# Altium PCB asar_feather.PcbDoc (part 2 of 4)
Units mm, origin at the board's own origin, x right, y up, seen from the top; angles counter-clockwise.
Board outline 50.8 x 22.86 mm, 6 copper layers (Top Layer, L2-GND, L3-SIG, L4-SIG, L5-VCC3V3, Bottom Layer), stack 1.568 mm thick; 174 components, 154 nets, 827 pads, 1521 vias.
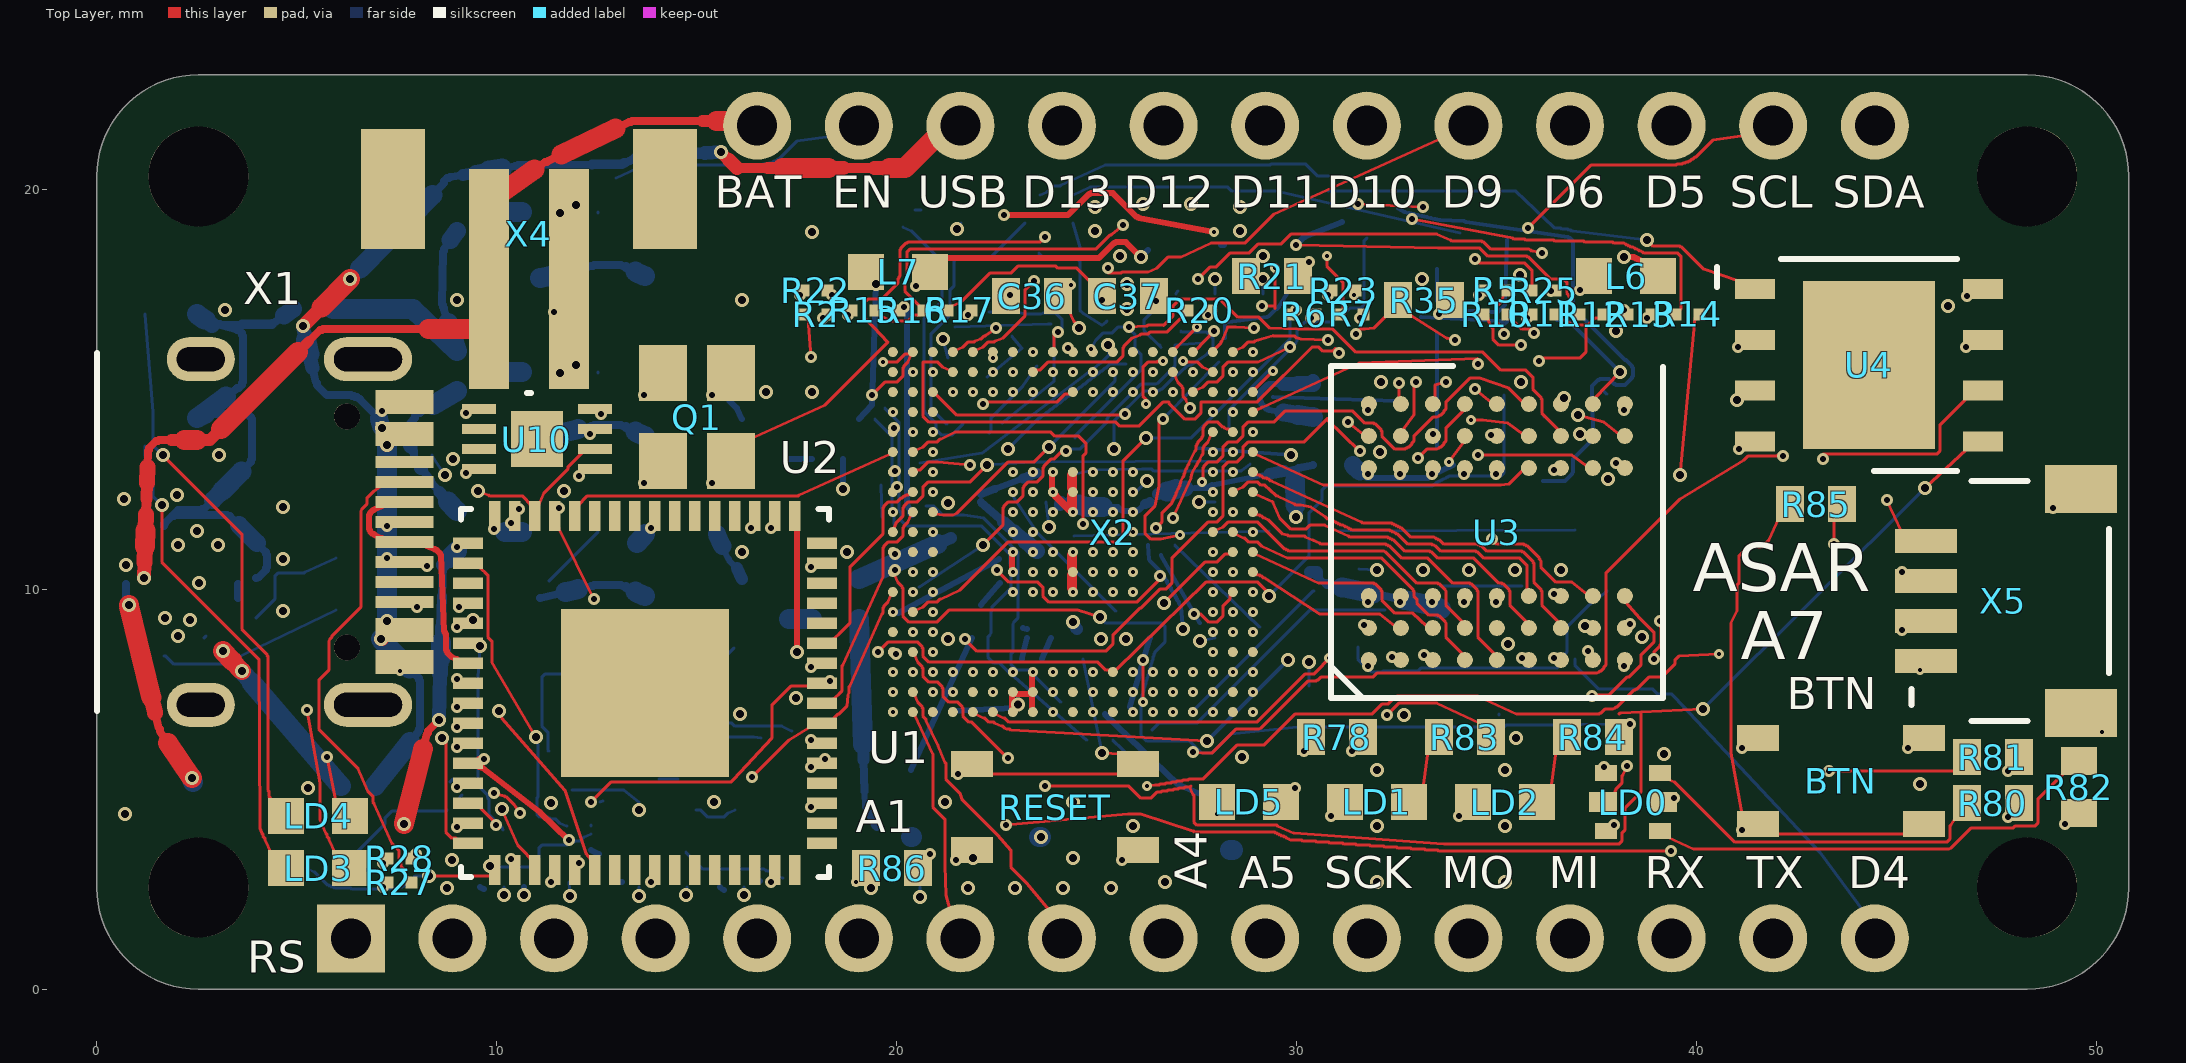
[diagram p0: Top Layer view]

## Part data (continued)
R5 R10 R11 R12 R13 R14 R15 R16 R17: library part R-US_R0201, "RESISTOR, American symbol", DeviceName=R0201, DeviceSetName=R-US_, GateName_1=G$1, LibraryName=rcl, MANF=Yageo, SPEC="thick film +-1%, 1/20W, 0201", SymbolName_1=R-US
  R5: MANF#=RC0201FR-075K1L, MOUSER#=301-5.1K-RC
  R10 R14: MANF#=RC0201FR-072K32L
  R11 R15: MANF#=RC0201FR-071KL
  R12 R16: MANF#=RC0201FR-07140RL
  R13 R17: MANF#=RC0201FR-07845RL
R18 R21 R78 R80 R81 R82 R83 R84 R85 R86 R102 R103 R104 R105 R106 R107 R108: library part R-US_SMALLR0402, "RESISTOR, American symbol, small 2-zigzag variant (sheet 2 only)", DeviceName=R0402, DeviceSetName=R-US_SMALL, GateName_1=G$1, LibraryName=rcl, MANF=Yageo, SymbolName_1=R-US_SMALL
  R18: MANF#=RC0402FR-0712KL, NOTE="Stays 0402 deliberately. Power is trivial (0.9 mW) and 1 percent is 1 percent at any size, but this is the FT2232's RREF -- it sets the USB transceiver bias current. There is no space pressure on this board any more, so there is nothing to gain against a part whose drift shows up as USB signal quality.", SPEC="thick film +-1%, 1/16W, 0402"
  R21: MANF#=RC0402FR-071KL, SPEC="thick film +-1%, 1/16W, 0402"
  R78: MANF#=RC0402FR-07680RL, SPEC="thick film +-1%, 1/16W, 0402"
  R80 R82: MANF#=RC0402FR-0733RL, NOTE="RGB LED balance. The green and blue dice are 3.3 V-class parts on a 3.3 V rail, so the resistor never dominates their current -- that is structural and no resistor value fixes it. What the values CAN do is stop red swamping the other two. As built, and as Cmod A7 ships the same LED, 182/182/100 gave red 6.9 mA against green 1.9 and blue 1.5: red about four times either. At 330/33/33 it is red 3.8, green 2.9, blue 2.9. Worst case improves too, not just nominal -- green with a part 0.15 V high in Vf goes from 1.4 mA to 1.8. Lower resistors do make the current MORE sensitive in percentage terms, 77 percent of nominal retained at 100R against 61 at 33R, but the absolute floor is what you see and it rises. Currents read off the datasheet's own Vf/If curve at the working point, not off the 20 mA table.", SPEC="thick film +-1%, 1/16W, 0402"
  R81: MANF#=RC0402FR-07330RL, NOTE="RGB LED balance. The green and blue dice are 3.3 V-class parts on a 3.3 V rail, so the resistor never dominates their current -- that is structural and no resistor value fixes it. What the values CAN do is stop red swamping the other two. As built, and as Cmod A7 ships the same LED, 182/182/100 gave red 6.9 mA against green 1.9 and blue 1.5: red about four times either. At 330/33/33 it is red 3.8, green 2.9, blue 2.9. Worst case improves too, not just nominal -- green with a part 0.15 V high in Vf goes from 1.4 mA to 1.8. Lower resistors do make the current MORE sensitive in percentage terms, 77 percent of nominal retained at 100R against 61 at 33R, but the absolute floor is what you see and it rises. Currents read off the datasheet's own Vf/If curve at the working point, not off the 20 mA table.", SPEC="thick film +-1%, 1/16W, 0402"
  R83 R84: MANF#=RC0402FR-07330RL, SPEC="thick film +-1%, 1/16W, 0402"
  R85 R86: MANF#=RC0402FR-0710KL, SPEC="thick film +-1%, 1/16W, 0402"
  R102: MANF#=RC0402FR-073K57L, SPEC="thick film +-1%, 1/16W, 0402 -- ISET: 870 / 3.57k = 244 mA fast-charge current"
  R103: MANF#=RC0402FR-073K09L, SPEC="thick film +-1%, 1/16W, 0402 -- ILIM: 1530 / 3.09k = 495 mA input current limit (EN2 = VU, EN1 = GND select the resistor)"
  R104: MANF#=RC0402FR-0756K2L, SPEC="thick film +-1%, 1/16W, 0402 -- TMR: 10 x 56.2k x 48 s/k = 7.5 h fast-charge and 45 min precharge safety timers"
  R105: MANF#=RC0402FR-074K32L, SPEC="thick film +-1%, 1/16W, 0402 -- ITERM: 0.03 A x 4.32k / 3.57k = 36 mA termination (15 % of the charge current)"
  R106: MANF#=RC0402FR-0710KL, SPEC="thick film +-1%, 1/16W, 0402 -- TS: fixed 10k disables the pack-temperature check (2-pin pack, no NTC); the pack must carry its own protection"
  R107: MANF#=RC0402FR-071K5L, SPEC="thick film +-1%, 1/16W, 0402 -- PGOOD LED current: (4.4 - 2.1) / 1.5k = 1.5 mA"
  R108: MANF#=RC0402FR-071K5L, SPEC="thick film +-1%, 1/16W, 0402 -- CHG LED current: (4.4 - 2.0) / 1.5k = 1.6 mA"
R19 R20 R22 R23 R24 R25 R26 R27 R28 R90 R91 R92 R93 R94 R96 R97 R98 R99 R101: library part R-US_SMALLR0201, "RESISTOR, American symbol, small 2-zigzag variant (sheet 2 only)", DeviceName=R0201, DeviceSetName=R-US_SMALL, GateName_1=G$1, LibraryName=rcl, MANF=Yageo, SPEC="thick film +-1%, 1/20W, 0201", SymbolName_1=R-US_SMALL
  R19 R90 R91 R92 R93 R94 R96 R97 R98: MANF#=RC0201FR-0710KL
  R20 R22 R23: MANF#=RC0201FR-071KL
  R24 R25: MANF#=RC0201FR-0733RL
  R26: MANF#=RC0201FR-07100KL
  R27 R28: MANF#=RC0201FR-075K1L
  R99: MANF#=RC0201FR-074K7L
  R101: MANF#=RC0201FR-072K21L
R34: library part RES4742, "Resistor 4-pack   Package of four resistors.", DeviceName=742, DeviceSetName=RES4, DIGIKEY#=742C083???JPCT-ND, GateName_1=A, GateName_2=B, GateName_3=C, GateName_4=D, LibraryName=ctambe, MANF=CTS, MANF#=742C083472JP, MOUSER#=774-742C083???JP, NOTE="The microSD DAT0-3 pull-ups, all four elements used -- which is what an array is actually for. R1, R2 and R4 used 2, 3 and 6 of theirs in the EAGLE original and were split into discretes during the import; on 2026-09-09 R1 and R4 went back into arrays of their own (742C043472JP and 742C163101JP), so all three arrays on this board are CTS 74x concave parts sharing one land-pattern rule. R2 is still a discrete. 4.7k is the conventional value for SD data lines and it was already chosen; only the part number was missing. 5 percent is ample for a pull-up, so this is a J part where the discrete resistors on this board are F. CTS 742C is the family the footprint is named after. Confirm the suffix -- it encodes tolerance and packaging and is the easy thing to get wrong.", SPEC="4x4.7K isolated array 0603x4, 0.8 mm pitch; direct successor of the obsolete JTR", SymbolName_1=R1NV0, SymbolName_2=R1NV0, SymbolName_3=R1NV0, SymbolName_4=R1NV0
R35: library part R-US_R0402, "RESISTOR, American symbol", DeviceName=R0402, DeviceSetName=R-US_, GateName_1=G$1, LibraryName=rcl, MANF=Yageo, MANF#=RC0402FR-074K7L, SPEC="thick film +-1%, 1/16W, 0402", SymbolName_1=R-US
U1: library part XC7A35T-CPG236-1CPG236C, "Xilinx Artix-7 XC7A35T-2CPG236I   Replacement for the Spartan-6 XC6SLX25-FT256. See design notes: SDRAM/microSD/GPIO ball assignments verified against Digilent Cmod A7-35T (same device+package); config/JTAG/power ball assignments are functionally correct placeholders pending verification against the official Xilinx pinout file.", POWER=POWER, BANK216="BANK 216", DeviceName=-2CPG236I, DeviceSetName=XC7A35T-CPG236, GATE=SDRAM_A0, GateName_1=PWR, GateName_2=GND, GateName_3=BANK216, GateName_4=PART_VALUE, GateName_5=SDRAM_A0, GateName_6=SDRAM_A1, GateName_7=SDRAM_A2, GateName_8=SDRAM_A3, GateName_9=SDRAM_A4, GateName_10=SDRAM_A5, GateName_11=SDRAM_A6, GateName_12=SDRAM_A7, GateName_13=SDRAM_A8, GateName_14=SDRAM_A9, GateName_15=SDRAM_A10, GateName_16=SDRAM_A11, GateName_17=SDRAM_A12, GateName_18=SDRAM_BA0, GateName_19=SDRAM_BA1, GateName_20=SDRAM_CAS#, GateName_21=SDRAM_RAS#, GateName_22=SDRAM_WE#, GateName_23=SDRAM_CS#, GateName_24=SDRAM_CKE, GateName_25=SDRAM_CLK, GateName_26=SDRAM_LDQM, GateName_27=SDRAM_UDQM, GateName_28=SDRAM_DQ0, GateName_29=SDRAM_DQ1, GateName_30=SDRAM_DQ2, GateName_31=SDRAM_DQ3, GateName_32=SDRAM_DQ4, GateName_33=SDRAM_DQ5, GateName_34=SDRAM_DQ6, GateName_35=SDRAM_DQ7, GateName_36=SDRAM_DQ8, GateName_37=SDRAM_DQ9, GateName_38=SDRAM_DQ10, GateName_39=SDRAM_DQ11, GateName_40=SDRAM_DQ12, GateName_41=SDRAM_DQ13, GateName_42=SDRAM_DQ14, GateName_43=SDRAM_DQ15, GateName_44=SPI_SPI_CCLK, GateName_45=SPI_D00_MOSI, GateName_46=SPI_D01_DIN, GateName_47=SPI_FCS_B, GateName_48=SD_DAT3, GateName_49=SD_DAT2, GateName_50=SD_DAT1, GateName_51=CHAN0, GateName_52=CHAN1, GateName_53=CHAN2, GateName_54=CHAN3, GateName_55=CHAN4, GateName_56=CHAN5, GateName_57=CHAN6, GateName_58=CHAN7, GateName_59=CHAN8, GateName_60=CHAN9, GateName_61=CHAN10, GateName_62=CHAN11, GateName_63=IO_W7, GateName_64=CHAN12, GateName_65=CHAN13, GateName_66=CHAN14, GateName_67=CHAN15, GateName_68=CHAN16, GateName_69=CHAN17, GateName_70=CHAN18, GateName_71=CHAN19, GateName_72=CHAN20, GateName_73=CHAN21, GateName_74=CHAN22, GateName_75=CHAN23, GateName_76=CHAN24, GateName_77=CHAN25, GateName_78=CHAN26, GateName_79=CHAN27, GateName_80=UART_CTS, GateName_81=CHAN-CLK, GateName_82=XADC_P, GateName_83=USB_PWREN, GateName_84=XADC_N, GateName_85=CLK12M, GateName_86=UART_TXD, GateName_87=UART_RXD, GateName_88=PROGRAM_B, GateName_89=INIT_B, GateName_90=DONE, GateName_91=TCK, GateName_92=TMS, GateName_93=TDI, GateName_94=TDO, GateName_95=M0, GateName_96=M1, GateName_97=M2, GateName_98=CFGBVS, GateName_99=PUDC_B, GateName_100=MGTPRXP0, GateName_101=MGTPRXN0, GateName_102=MGTPRXP1, GateName_103=MGTPRXN1, GateName_104=GNDADC, GateName_105=VCCADC, GateName_106=VP, GateName_107=VN, GateName_108=VREFP, GateName_109=VREFN, GateName_110=DXP, GateName_111=DXN, GateName_112=MGTPTXP0, GateName_113=MGTPTXN0, GateName_114=MGTPTXP1, GateName_115=MGTREFCLK0P, GateName_116=MGTREFCLK0N, GateName_117=MGTREFCLK1P, GateName_118=MGTREFCLK1N, GateName_119=MGTPTXN1, GateName_120=CHAN28, GateName_121=LED2, GateName_122=LED0_R, GateName_123=IO_A14, GateName_124=IO_A15, GateName_125=IO_A16, GateName_126=LED1, GateName_127=BTN, GateName_128=SD_DAT0, GateName_129=LED0_G, GateName_130=IO_W19, GateName_131=LED0_B, GateName_132=IO_C15, GateName_133=IO_B15, GateName_134=SD_CLK, GateName_135=UART_RTS, GateName_136=IO_N2, GateName_137=SD_CMD, GateName_138=UART_DTR, GateName_139=SPI_D03, GateName_140=SPI_D02, GateName_141=XADC1_P, GateName_142=XADC1_N, GND=GND, LibraryName=ctambe, MANF=AMD/Xilinx, MANF#=XC7A35T-2CPG236I, PART=U1, SymbolName_1=A7_PWR, SymbolName_2=A7_GND, SymbolName_3=A7_BANK216, SymbolName_4=PV_GATE, SymbolName_5=PIN_GATE_IO, SymbolName_6=PIN_GATE_IO, SymbolName_7=PIN_GATE_IO, SymbolName_8=PIN_GATE_IO, SymbolName_9=PIN_GATE_IO, SymbolName_10=PIN_GATE_IO, SymbolName_11=PIN_GATE_IO, SymbolName_12=PIN_GATE_IO, SymbolName_13=PIN_GATE_IO, SymbolName_14=PIN_GATE_IO, SymbolName_15=PIN_GATE_IO, SymbolName_16=PIN_GATE_IO, SymbolName_17=PIN_GATE_IO, SymbolName_18=PIN_GATE_IO, SymbolName_19=PIN_GATE_IO, SymbolName_20=PIN_GATE_IO, SymbolName_21=PIN_GATE_IO, SymbolName_22=PIN_GATE_IO, SymbolName_23=PIN_GATE_IO, SymbolName_24=PIN_GATE_IO, SymbolName_25=PIN_GATE_IO, SymbolName_26=PIN_GATE_IO, SymbolName_27=PIN_GATE_IO, SymbolName_28=PIN_GATE_IO, SymbolName_29=PIN_GATE_IO, SymbolName_30=PIN_GATE_IO, SymbolName_31=PIN_GATE_IO, SymbolName_32=PIN_GATE_IO, SymbolName_33=PIN_GATE_IO, SymbolName_34=PIN_GATE_IO, SymbolName_35=PIN_GATE_IO, SymbolName_36=PIN_GATE_IO, SymbolName_37=PIN_GATE_IO, SymbolName_38=PIN_GATE_IO, SymbolName_39=PIN_GATE_IO, SymbolName_40=PIN_GATE_IO, SymbolName_41=PIN_GATE_IO, SymbolName_42=PIN_GATE_IO, SymbolName_43=PIN_GATE_IO, SymbolName_44=PIN_GATE_IO, SymbolName_45=PIN_GATE_IO, SymbolName_46=PIN_GATE_IO, SymbolName_47=PIN_GATE_IO, SymbolName_48=PIN_GATE_IO, SymbolName_49=PIN_GATE_IO, SymbolName_50=PIN_GATE_IO, SymbolName_51=PIN_GATE_IO, SymbolName_52=PIN_GATE_IO, SymbolName_53=PIN_GATE_IO, SymbolName_54=PIN_GATE_IO, SymbolName_55=PIN_GATE_IO, SymbolName_56=PIN_GATE_IO, SymbolName_57=PIN_GATE_IO, SymbolName_58=PIN_GATE_IO, SymbolName_59=PIN_GATE_IO, SymbolName_60=PIN_GATE_IO, SymbolName_61=PIN_GATE_IO, SymbolName_62=PIN_GATE_IO, SymbolName_63=PIN_GATE_IO, SymbolName_64=PIN_GATE_IO, SymbolName_65=PIN_GATE_IO, SymbolName_66=PIN_GATE_IO, SymbolName_67=PIN_GATE_IO, SymbolName_68=PIN_GATE_IO, SymbolName_69=PIN_GATE_IO, SymbolName_70=PIN_GATE_IO, SymbolName_71=PIN_GATE_IO, SymbolName_72=PIN_GATE_IO, SymbolName_73=PIN_GATE_IO, SymbolName_74=PIN_GATE_IO, SymbolName_75=PIN_GATE_IO, SymbolName_76=PIN_GATE_IO, SymbolName_77=PIN_GATE_IO, SymbolName_78=PIN_GATE_IO, SymbolName_79=PIN_GATE_IO, SymbolName_80=PIN_GATE_OUT, SymbolName_81=PIN_GATE_IO, SymbolName_82=PIN_GATE_IN, SymbolName_83=PIN_GATE_IN, SymbolName_84=PIN_GATE_IN, SymbolName_85=PIN_GATE_IN, SymbolName_86=PIN_GATE_IO, SymbolName_87=PIN_GATE_IO, SymbolName_88=PIN_GATE_IN, SymbolName_89=PIN_GATE_IN, SymbolName_90=PIN_GATE_IN, SymbolName_91=PIN_GATE_IN, SymbolName_92=PIN_GATE_IN, SymbolName_93=PIN_GATE_IN, SymbolName_94=PIN_GATE_IN, SymbolName_95=PIN_GATE_IN, SymbolName_96=PIN_GATE_IN, SymbolName_97=PIN_GATE_IN, SymbolName_98=PIN_GATE_IN, SymbolName_99=PIN_GATE_IN, SymbolName_100=PIN_GATE_IN, SymbolName_101=PIN_GATE_IN, SymbolName_102=PIN_GATE_IN, SymbolName_103=PIN_GATE_IN, SymbolName_104=PIN_GATE_IN, SymbolName_105=PIN_GATE_IN, SymbolName_106=PIN_GATE_IN, SymbolName_107=PIN_GATE_IN, SymbolName_108=PIN_GATE_IN, SymbolName_109=PIN_GATE_IN, SymbolName_110=PIN_GATE_IN, SymbolName_111=PIN_GATE_IN, SymbolName_112=PIN_GATE_IN, SymbolName_113=PIN_GATE_IN, SymbolName_114=PIN_GATE_IN, SymbolName_115=PIN_GATE_IN, SymbolName_116=PIN_GATE_IN, SymbolName_117=PIN_GATE_IN, SymbolName_118=PIN_GATE_IN, SymbolName_119=PIN_GATE_IN, SymbolName_120=PIN_GATE_IN, SymbolName_121=PIN_GATE_IN, SymbolName_122=PIN_GATE_IN, SymbolName_123=PIN_GATE_IN, SymbolName_124=PIN_GATE_IN, SymbolName_125=PIN_GATE_IN, SymbolName_126=PIN_GATE_IN, SymbolName_127=PIN_GATE_IN, SymbolName_128=PIN_GATE_IO, SymbolName_129=PIN_GATE_IN, SymbolName_130=PIN_GATE_IN, SymbolName_131=PIN_GATE_IN, SymbolName_132=PIN_GATE_IN, SymbolName_133=PIN_GATE_IN, SymbolName_134=PIN_GATE_IO, SymbolName_135=PIN_GATE_IN, SymbolName_136=PIN_GATE_IN, SymbolName_137=PIN_GATE_IO, SymbolName_138=PIN_GATE_IN, SymbolName_139=PIN_GATE_IO, SymbolName_140=PIN_GATE_IO, SymbolName_141=PIN_GATE_IN, SymbolName_142=PIN_GATE_IN
U2: library part FT2232HQ-QFN64, "FTDI FT2232HL Dual USB-UART/MPSSE Bridge, LQFP-64. Channel A = MPSSE JTAG to the FPGA (ADBUS0-3 = TCK/TDI/TDO/TMS, ADBUS4/5 = PROG#/DONE). Channel B = UART (BDBUS0-4 = TXD/RXD/RTS#/CTS#/DTR#). Same pin numbering as the FT2232HQ, no exposed pad. Replaced the FT2232HQ on 2026-09-09.", DeviceName=-QFN64, DeviceSetName=FT2232HL, FT2232HL=FT2232HL, GateName_1=G$1, LibraryName=ctambe, MANF=FTDI, MANF#=FT2232HQ-REEL, NOTE="FT2232HL-REEL: Digi-Key 0 with 1,000 expected 19-Feb-2027 ($5.30, 50-week lead); LCSC C27882 4,767 in stock at $11.45 (not an FTDI-authorized channel: name it explicitly or consign for a PCBWay build). Pin numbers unchanged from the FT2232HQ; the QFN exposed pad (pin EP, GND) has no LQFP counterpart, so that pin and its ground stub were removed. thetaJA 37.66 C/W for the LQFP vs 29.67 for the QFN (DS_FT2232H Table 5.7). Footprint FT2232HL-LQFP64 to be drawn from Figure 8.2 or FTDI TN_166. Alternates on the same pin numbers: FT2232HQ (QFN-64) and FT4232HL / FT4232HQ (UART lands on channel C, EEPROM re-templated, PID 0x6011); the FT2232H-56Q keeps every signal but renumbers every pin.", SPEC="USB 2.0 Hi-Speed dual-channel UART/FIFO/MPSSE bridge, QFN-64 9 x 9 mm, 0.5 mm pitch, 4.35 mm exposed pad (not internally grounded; left without a net). Same pin numbers as FT2232HL.", SymbolName_1=FT2232HQ-BOX
U3: library part SDRAM-X16-ALLIANCE-512M, "SDR SDRAM, x16, 54-pin TSOP-II   The 54-pin TSOP-II x16 SDR pinout is identical for 256Mb and 512Mb: both use row A0-A12 with banks BA0/BA1, and pin 40 is NC on both. They differ only in the column address width -- A0-A8 (512 columns) at 256Mb, A0-A9 (1024 columns) at 512Mb -- which is a memory-controller setting, not a wiring change.", DeviceName=-ALLIANCE-512M, DeviceSetName=SDRAM-X16, GATE=VDD@3, GateName_1=PART_VALUE, GateName_2=VDD@3, GateName_3=DQ0, GateName_4=VDDQ@3, GateName_5=DQ1, GateName_6=DQ2, GateName_7=VSSQ@3, GateName_8=DQ3, GateName_9=DQ4, GateName_10=VDDQ@2, GateName_11=DQ5, GateName_12=DQ6, GateName_13=VSSQ@2, GateName_14=DQ7, GateName_15=VDD@2, GateName_16=LDQM, GateName_17=WE#, GateName_18=CAS#, GateName_19=RAS#, GateName_20=CS#, GateName_21=BA0, GateName_22=BA1, GateName_23=A10, GateName_24=A0, GateName_25=A1, GateName_26=A2, GateName_27=A3, GateName_28=VDD@1, GateName_29=VSS@1, GateName_30=A4, GateName_31=A5, GateName_32=A6, GateName_33=A7, GateName_34=A8, GateName_35=A9, GateName_36=A11, GateName_37=A12, GateName_38=CKE, GateName_39=CLK, GateName_40=UDQM, GateName_41=NC, GateName_42=VSS@2, GateName_43=DQ8, GateName_44=VDDQ@1, GateName_45=DQ9, GateName_46=DQ10, GateName_47=VSSQ@4, GateName_48=DQ11, GateName_49=DQ12, GateName_50=VDDQ@4, GateName_51=DQ13, GateName_52=DQ14, GateName_53=VSSQ@1, GateName_54=DQ15, GateName_55=VSS@3, LibraryName=ctambe, MANF="Alliance Memory", MANF#=AS4C32M16SB-7BIN, NOTE="512Mbit (32M x 16) = 64MB, 54-ball FBGA 8 x 8 mm, 0.8 mm pitch, industrial. Same die as the TSOP-II AS4C32M16SB-7TCN; ball map from datasheet Rev 1.2 Figure 1.1 (JEDEC x16).", PART=U3, SymbolName_1=PART_VALUE-SDRAM-X16, SymbolName_2=PL-SDRAM-X16, SymbolName_3=PL-SDRAM-X16, SymbolName_4=PL-SDRAM-X16, SymbolName_5=PL-SDRAM-X16, SymbolName_6=PL-SDRAM-X16, SymbolName_7=PL-SDRAM-X16, SymbolName_8=PL-SDRAM-X16, SymbolName_9=PL-SDRAM-X16, SymbolName_10=PL-SDRAM-X16, SymbolName_11=PL-SDRAM-X16, SymbolName_12=PL-SDRAM-X16, SymbolName_13=PL-SDRAM-X16, SymbolName_14=PL-SDRAM-X16, SymbolName_15=PL-SDRAM-X16, SymbolName_16=PL-SDRAM-X16, SymbolName_17=PL-SDRAM-X16, SymbolName_18=PL-SDRAM-X16, SymbolName_19=PL-SDRAM-X16, SymbolName_20=PL-SDRAM-X16, SymbolName_21=PL-SDRAM-X16, SymbolName_22=PL-SDRAM-X16, SymbolName_23=PL-SDRAM-X16, SymbolName_24=PL-SDRAM-X16, SymbolName_25=PL-SDRAM-X16, SymbolName_26=PL-SDRAM-X16, SymbolName_27=PL-SDRAM-X16, SymbolName_28=PL-SDRAM-X16, SymbolName_29=PL-SDRAM-X16, SymbolName_30=PL-SDRAM-X16, SymbolName_31=PL-SDRAM-X16, SymbolName_32=PL-SDRAM-X16, SymbolName_33=PL-SDRAM-X16, SymbolName_34=PL-SDRAM-X16, SymbolName_35=PL-SDRAM-X16, SymbolName_36=PL-SDRAM-X16, SymbolName_37=PL-SDRAM-X16, SymbolName_38=PL-SDRAM-X16, SymbolName_39=PL-SDRAM-X16, SymbolName_40=PL-SDRAM-X16, SymbolName_41=PL-SDRAM-X16, SymbolName_42=PL-SDRAM-X16, SymbolName_43=PL-SDRAM-X16, SymbolName_44=PL-SDRAM-X16, SymbolName_45=PL-SDRAM-X16, SymbolName_46=PL-SDRAM-X16, SymbolName_47=PL-SDRAM-X16, SymbolName_48=PL-SDRAM-X16, SymbolName_49=PL-SDRAM-X16, SymbolName_50=PL-SDRAM-X16, SymbolName_51=PL-SDRAM-X16, SymbolName_52=PL-SDRAM-X16, SymbolName_53=PL-SDRAM-X16, SymbolName_54=PL-SDRAM-X16, SymbolName_55=PL-SDRAM-X16
U4: library part SPI_FLASH-SOIC_150_208, "SPI Flash", DeviceName=-SOIC_150_208, DeviceSetName=SPI_FLASH, DIGIKEY#=W25Q128JVSIQ-ND, GATE=CS#, GateName_1=PART, GateName_2=CS#, GateName_3=DO, GateName_4=WP#, GateName_5=GND, GateName_6=DI, GateName_7=CLK, GateName_8=HOLD#, GateName_9=VCC, LibraryName=ctambe, MANF=Winbond, MANF#=W25Q128JVPIQ, NOTE="128Mbit quad SPI, SOIC-8 208mil. The XC7A35T bitstream is 17,536,096 bits, so the previous W25Q80BV (8Mbit) could not boot the part at all. 128Mbit leaves ~14MB for user data above the bitstream.", PART=U4, SymbolName_1=PV_GATE, SymbolName_2=PIN_GATE_IN, SymbolName_3=PIN_GATE_OUT, SymbolName_4=PIN_GATE_IN, SymbolName_5=PIN_GATE_IN, SymbolName_6=PIN_GATE_IN, SymbolName_7=PIN_GATE_IN, SymbolName_8=PIN_GATE_IN, SymbolName_9=PIN_GATE_IN
U5: library part SC189-SOT23-5, "1.5A 2.5MHz synchronous buck, fixed output (Semtech SC189)", PartName=SC189Z, MANF=Semtech, MANF#=SC189ZSKTRT
U6: library part SC189-SOT23-5, "1.5A 2.5MHz synchronous buck, fixed output (Semtech SC189)", PartName=SC189L, MANF=Semtech, MANF#=SC189LSKTRT
U7: library part SC189-SOT23-5, "1.5A 2.5MHz synchronous buck, fixed output (Semtech SC189)", PartName=SC189A, MANF=Semtech, MANF#=SC189ASKTRT
U8: library part BQ24232-RGT16, "TI bq24232 single-cell Li-ion charger and power-path manager, 16-pin VQFN 3x3 (RGT) with thermal pad", DeviceName=RGT, DeviceSetName=BQ24232, GateName_1=G$1, LibraryName=ctambe, MANF="Texas Instruments", MANF#=BQ24232RGTR, NOTE="bq24232 (SLUS821J): USB5V0 into IN, OUT onto VU, battery on BAT/X4. With USB present OUT is 4.4 V (LDO) and the input is capped at 495 mA: DPPM trims the charge current first, then the battery supplements the load; the board therefore never draws more than the limit from the port. On battery alone VU = VBAT - 60 mV, and the 3.3 V buck holds regulation down to about 3.45 V. The +5V-INPUT path with D2 and D3 was removed on 2026-09-09, so the charger is the only input. Dissipation about 0.6 W worst case (0.3 W power path at 500 mA plus 0.3 W charging), a 27 C rise at 44.5 C/W. Battery-only start-up into the 40 uF on VU relies on the part's inrush sequence and the 250 mV / 250 us short-circuit detector: scope it on the first board. Footprint VQFN16-3X3-RGT to draw from the datasheet package drawing (3 x 3 mm, 0.5 mm pitch, 1.68 mm pad). Digi-Key 541 in stock at $1.93 on 2026-09-09.", SPEC="single-cell Li-ion/LiPo linear charger with power path, 16-pin VQFN 3 x 3 mm (RGT), IN 4.35-10.2 V with 10.5 V OVP, OUT 4.4 V regulated or VBAT - 60 mV on battery, input limit 495 mA (R103), charge 244 mA (R102), termination 36 mA (R105), 7.5 h timer (R104), TS disabled with 10k (R106), CE and EN1 to GND, EN2 to VU; thetaJA 44.5 C/W; added 2026-09-09 in place of D1", SymbolName_1=BQ24232
U10: library part EEPROM-93LC46B-I/SN, "Microchip 93LC46BT-I/SN, FTDI EEPROM (USB VID/PID/descriptors)   64 x 16 = 1 Kbit. DS_FT2232H p27: \"The EEPROM should be a 16 bit wide configuration such as a Microchip 93LC46B or equivalent capable of a 1 Mbit/s clock rate at VCC = +3.00 V to 3.6 V.\" The B suffix is the fixed x16 organisation, so pins 6 and 7 are both no-connect; only the selectable C variant puts ORG on pin 6.", 93LC46B=93LC46B, DeviceName=-I/MNY, DeviceSetName=EEPROM-93LC46B, GateName_1=G$1, LibraryName=ctambe, MANF=Microchip, MANF#=93LC46BT-I/MNY, SymbolName_1=EEPROM-93LC46B-BOX
X1: library part MINI-USB-105017-0001, "MINI USB Connector   Source: http://www.hirose.co.jp/cataloge_hp/e24000019.pdf", DeviceName=105017-0001, DeviceSetName=MINI-USB-, GateName_1=G$1, LibraryName=ctambe, MANF="HRO (Korean Hroparts)", MANF#=TYPE-C-31-M-12, SymbolName_1=MINI-USB
X2: library part ZULU-CONN, "Zulu A7 Board Connector", DeviceSetName=ZULU-CONN, GATE=D4, GateName_1=CHAN-CLK, GateName_2=CHAN0, GateName_3=CHAN1, GateName_4=CHAN2, GateName_5=CHAN3, GateName_6=CHAN4, GateName_7=CHAN5, GateName_8=CHAN6, GateName_9=CHAN7, GateName_10=CHAN8, GateName_11=CHAN9, GateName_12=CHAN10, GateName_13=CHAN11, GateName_14=+1.8V, GateName_15=+3.3V, GateName_16=GND, GateName_17=+1.0V, GateName_18=RST#, GateName_19=CHAN14, GateName_20=CHAN15, GateName_21=CHAN16, GateName_22=CHAN17, GateName_23=CHAN18, GateName_24=CHAN19, GateName_25=CHAN20, GateName_26=CHAN21, GateName_27=CHAN22, GateName_28=CHAN23, GateName_29=CHAN24, GateName_30=CHAN25, GateName_31=CHAN26, GateName_32=CHAN27, GateName_33=ANALOG-IO0, GateName_34=ANALOG-IO1, GateName_35=CHAN28, GateName_36=G$1, GateName_37=GND2, GateName_38=CHAN12, GateName_39=CHAN13, GateName_40=GND4, GateName_41=VU, LibraryName=ctambe, MANF=Sullins, MANF#="2x PRPC009SAAN-RC + 2x PRPC011SAAN-RC", NOTE="Pin field ZULU-DIP37: 40 pins of 1.016 mm on 2.54 mm pitch, two rows 22.86 mm (0.900 in) apart, numbered 1-40 straight through and skipping both landings. The rows are mirror images: top row pins 1-9 (x 59.69..39.37) = GND, CHAN-CLK, CHAN0..CHAN6, FOUR positions for the micro-USB X1 (36.83..29.21), pins 10-20 (26.67..1.27) = CHAN7..CHAN13, GND, +3.3V, +1.8V, +1.0V (channel order since 2026-09-09, power pins re-ordered 2026-10-07); bottom row pins 21-29 (59.69..39.37), FOUR positions for the LiPo header X4 at the SAME four x values (36.83..29.21), pins 30-40 (26.67..1.27), so X4 sits on the top side directly opposite the edge-mounted USB receptacle. Each landing is 12.70 mm between the neighbouring pin centres, 11.176 mm clear: the JST B2B-PH-SM4-TB body is 7.95 mm, so 1.61 mm each side. Reworked 2026-09-09 from the old 44-position pattern: +5V-INPUT with D2/D3, GND5, GND3 and +3.3V2 removed, CHAN12/CHAN13 moved to pins 2/3, the bottom row closed up, the field renumbered and the landing moved. Three grounds (1, 17, 21); 3.3 V for the header is pin 18 alone; pin 22 VU sources the 4.4 V rail. THE PCB FOOTPRINT MUST BE REDRAWN with 40 pads named 1-40 in these positions -- the imported ZULU-DIP37 still names 44. Sullins PRPC strips fit the holes (0.64 mm square pins, Sullins recommends 1.02 mm). Digi-Key 2026-09-08: PRPC009SAAN-RC 1,201 at $0.18, PRPC011SAAN-RC 428 at $0.22, two of each per board (the 1x11 stock covers about 200 boards). Alternate: any 2.54 mm 1x40 breakaway strip (LCSC Boomele C2337, 81,690) cut to 9 + 11 twice.", PART=X2, SPEC="four 0.1 in male breakaway header strips, 0.64 mm square gold-flash pins, 2.54 mm pitch, through-hole, mounted from the underside, two part numbers and two of each per board: PRPC009SAAN-RC 1x9 twice (pins 1-9 and 21-29) and PRPC011SAAN-RC 1x11 twice (pins 10-20 and 30-40); the two rows are cut identically since the LiPo landing was moved opposite the micro-USB on 2026-09-09", SymbolName_1=PIN_GATE_IO, SymbolName_2=PIN_GATE_IN, SymbolName_3=PIN_GATE_IO, SymbolName_4=PIN_GATE_IO, SymbolName_5=PIN_GATE_IO, SymbolName_6=PIN_GATE_IO, SymbolName_7=PIN_GATE_IO, SymbolName_8=PIN_GATE_IO, SymbolName_9=PIN_GATE_IN, SymbolName_10=PIN_GATE_IO, SymbolName_11=PIN_GATE_IO, SymbolName_12=PIN_GATE_IN, SymbolName_13=PIN_GATE_IO, SymbolName_14=PIN_GATE_IO, SymbolName_15=PIN_GATE_IO, SymbolName_16=PIN_GATE_IO, SymbolName_17=PIN_GATE_IO, SymbolName_18=PIN_GATE_IO, SymbolName_19=PIN_GATE_IO, SymbolName_20=PIN_GATE_IO, SymbolName_21=PIN_GATE_IN, SymbolName_22=PIN_GATE_IO, SymbolName_23=PIN_GATE_IO, SymbolName_24=PIN_GATE_IO, SymbolName_25=PIN_GATE_IO, SymbolName_26=PIN_GATE_IN, SymbolName_27=PIN_GATE_IO, SymbolName_28=PIN_GATE_IO, SymbolName_29=PIN_GATE_IN, SymbolName_30=PIN_GATE_IO, SymbolName_31=PIN_GATE_IO, SymbolName_32=PIN_GATE_IO, SymbolName_33=PIN_GATE_IO, SymbolName_34=PIN_GATE_IO, SymbolName_35=PIN_GATE_IO, SymbolName_36=PV_GATE, SymbolName_37=PIN_GATE_IO, SymbolName_38=PIN_GATE_IO, SymbolName_39=PIN_GATE_IO, SymbolName_40=PIN_GATE_IO, SymbolName_41=PIN_GATE_IO
X3: library part MICROSD_CONDM3D-SF, "microSD socket, push-pull, Hirose DM3D-SF", DeviceName=DM3D-SF, DeviceSetName=MICROSD_CON, GateName_1=G$1, HRS#=609-0025-8, LibraryName=ctambe, MANF=Hirose, MANF#=DM3D-SF, MOUSER#=MOUSER#, SPEC="microSD push-pull (no eject), top mount, 0.5 A; 8 contacts + 4 shell pads G1-G4 + card-detect switch A/B (open without card); DM3 catalog p9", SymbolName_1=MICROSD_CON
X4: library part JST-B2B-PH-SM4-TB, "JST PH 2.0 mm 2-pin top-entry SMT header, LiPo battery input", DeviceName=SM4-TB, DeviceSetName=JST-PH-2, GateName_1=G$1, LibraryName=ctambe, MANF=JST, MANF#=B2B-PH-SM4-TB(LF)(SN), NOTE="B2B-PH-SM4-TB(LF)(SN): 8 mm tall, wire leaves upward; the side-entry twin is S2B-PH-SM4-TB(LF)(SN) (5.5 mm). There is no polarity standard for JST-PH LiPo packs: check pin 1 = + against the pack before plugging in. Footprint JST-B2B-PH-SM4-TB to draw from the catalog page (two contact pads on 2.0 mm plus two 1.6 x 3.0 mm fixing pads). Digi-Key 57,541 in stock at $0.47 on 2026-09-09.", SPEC="JST PH 2.0 mm, 2 circuits, top-entry SMT header with fixing tabs, 2 A, 100 V, -25..85 C, mates with PHR-2 housing; pin 1 = battery +, pin 2 = GND", SymbolName_1=CONN-2
X5: library part JST-SM04B-SRSS-TB, "JST SH 1.0 mm 4-pin side-entry SMT header, STEMMA QT / Qwiic port", DeviceName=SM04B-SRSS-TB, DeviceSetName=JST-SH-4, GateName_1=G$1, LibraryName=ctambe, MANF=JST, MANF#=SM04B-SRSS-TB(LF)(SN), NOTE="STEMMA QT port on the Feather I2C pins (X2-27 SCL, X2-28 SDA). V+ is VCC3V3, so the devices pull SDA and SCL up to 3.3 V; devices carry the pull-ups, the board has none. The FPGA pins are not 5 V tolerant. 2.95 mm tall, fits under a stacked FeatherWing; the plug leaves past the board end opposite the USB.", SPEC="JST SH 1.0 mm, 4 circuits, side-entry SMT header with fixing tabs, 1 A, 50 V, -25..85 C, mates with SHR-04V-S housing; STEMMA QT / Qwiic order: pin 1 GND, 2 V+, 3 SDA, 4 SCL", SymbolName_1=CONN-4
U$2: CC=CC, DeviceSetName=CC_CC, GateName_1=G$1, LibraryName=ctambe, SymbolName_1=CC_CC
U$3: BY=BY, DeviceSetName=CC_BY, GateName_1=G$1, LibraryName=ctambe, SymbolName_1=CC_BY
U$4: DeviceSetName=CC_SA, GateName_1=G$1, LibraryName=ctambe, SA=SA, SymbolName_1=CC_SA
U$5: C=C, DeviceSetName=CC_COPYRIGHT, GateName_1=G$1, LibraryName=ctambe, SymbolName_1=CC_COPYRIGHT

## Via types
v1: diameter 0.27, hole 0.15, L3-SIG to L4-SIG, tented both sides, 233 vias
v2: diameter 0.3, hole 0.15, L5-VCC3V3 to Bottom Layer, tented both sides, 219 vias
v3: diameter 0.3, hole 0.15, Top Layer to L2-GND, tented both sides, 208 vias
v4: diameter 0.25, hole 0.1, Top Layer to L2-GND, tented both sides, 175 vias
v5: diameter 0.3, hole 0.15, L2-GND to L3-SIG, tented both sides, 171 vias
v6: diameter 0.3, hole 0.15, L4-SIG to L5-VCC3V3, tented both sides, 171 vias
v7: diameter 0.35, hole 0.2, Top Layer to Bottom Layer, tented both sides, 165 vias
v8: diameter 0.25, hole 0.1, L2-GND to L3-SIG, tented both sides, 106 vias
v9: diameter 0.25, hole 0.1, L4-SIG to L5-VCC3V3, tented both sides, 49 vias
v10: diameter 0.25, hole 0.1, L5-VCC3V3 to Bottom Layer, tented both sides, 24 vias

## Nets (pads, with @x,y where several pads share a name; then routed paths per layer and width w, separated by ;. In a path a pad name is that pad's centre, name@x,y a point inside that pad or via, vN(x,y) a via of type N, cw(c..) or ccw(c..) an arc to the next point about the centre after c; other vN are vias at no path point)
A0: U1.T2 U3.H7 | length 9.1
  Top Layer w0.076: v3(34.525,13.35) 36.875,13.35 U3.H7@37.25,13.075
  L3-SIG w0.1: v8@28.4,14.425 28.95,14.25 29,14.225 29.025,14.2 29.05,14.2 29.225,14.025 32.175,13.775 32.2,13.75 32.225,13.75 v3(34.525,13.35)
  other v4: 28.4,14.43
  other v5: 34.525,13.35
  other v8: 28.4,14.43
A1: U1.T3 U3.H8 | length 9.5
  Top Layer w0.076: v7(37.075,13.875) U3.H8@37.25,13.875
  L4-SIG w0.1: v1@27.9,14.425 28.95,14.25 29,14.225 29.025,14.2 29.05,14.2 29.375,13.875 v7(37.075,13.875)
  other v1: 27.9,14.43
  other v4: 27.9,14.43
  other v8: 27.9,14.43
A2: U1.U2 U3.J8 | length 10.4
  Top Layer w0.076: v7(37.025,14.35) 37.675,14.175 U3.J8@38.05,13.875
  L3-SIG w0.1: v8@28.4,14.925 28.45,14.875 32.9,14.825 33.05,14.675 33.107,14.675 ; 33.1,14.675 v1(33.525,14.825) ; v1@34.231,14.675 34.55,14.675 34.75,14.693 ; v1(34.275,14.6) v1@34.275,14.675 ; 34.75,14.7 34.825,14.7 34.85,14.675 34.875,14.675 34.9,14.65 34.925,14.65 35,14.575 35.05,14.575 v1(35.2,14.45)
  L4-SIG w0.1: v1(33.525,14.825) 33.75,14.6 v1(34.275,14.6) ; v1(35.2,14.45) 35.325,14.55 35.425,14.65 35.45,14.65 35.525,14.675 ; 35.531,14.675 36.275,14.675 36.3,14.65 36.325,14.65 36.625,14.35 v7(37.025,14.35)
  other v4: 28.4,14.93
  other v8: 28.4,14.93
A3: U1.T1 U3.J7 | length 11.1
  Top Layer w0.076: U1.T1@28.975,14.475 29,14.475 29.025,14.5 29.05,14.5 29.1,14.525 29.125,14.55 29.15,14.55 31.55,15.65 v3@34.519,15.766 ; 34.425,15.75 34.425,15.725 v3(34.525,15.625) ; v3(37.975,13.15) U3.J7@38.05,13.075
  L3-SIG w0.1: v3(34.525,15.625) 34.75,15.775 35.7,15.525 35.725,15.5 35.75,15.5 35.925,15.325 35.925,15.3 35.95,15.275 35.95,15.025 36.5,14.475 36.5,14.45 36.525,14.425 36.525,13.95 37.325,13.15 v3(37.975,13.15)
  other v5: 37.975,13.15 34.525,15.625
A4: U1.R3 U3.J3 | length 19.5
  Top Layer w0.076: v3(26.9,11.775) 27.36,12.79 ; 27.35,12.8 27.375,12.9 27.475,13.075 27.5,13.1 27.5,13.125 27.525,13.15 27.525,13.175 27.575,13.225 27.575,13.25 27.625,13.35 27.65,13.375 27.65,13.4 27.65,13.525 27.675,13.55 27.675,13.575 27.775,13.675 U1.R3@27.85,13.85 ; v3(37.375,7.325) 37.4,7.35 37.8,7.35 38.25,7.8 38.3,7.8 38.6,8.1 38.6,8.35 38.925,8.675 38.925,8.925 38.575,9.275 U3.J3@38.225,9.675
  L3-SIG w0.1: v6(26.6,10.85) v3(26.9,11.775) ; v1(28.175,8.2) 28.3,8.2 29.025,7.475 29.05,7.475 29.075,7.45 29.1,7.45 29.125,7.425 v3(37.375,7.325)
  L4-SIG w0.1: v6(27.575,9.15) 27.6,9.15 28.175,8.575 v1(28.175,8.2)
  Bottom Layer w0.1: v6(26.6,10.85) v6(27.575,9.15)
  other v1: 26.6,10.85
  other v2: 27.575,9.15 26.6,10.85
  other v5: 37.375,7.325 26.9,11.775
A5: U1.R2 U3.J2 | length 21.1
  Top Layer w0.076: v3(26.475,11.525) 26.625,11.675 26.625,11.9 26.875,12.15 26.875,12.175 26.9,12.2 26.9,12.225 26.925,12.25 26.925,12.275 26.95,12.3 26.95,12.325 26.975,12.35 26.975,12.4 27,12.425 27,12.45 27.025,12.5 27.05,12.525 27.05,12.55 27.065,12.581 ; 27.075,12.575 27.075,12.625 27.1,12.7 27.15,12.8 27.175,12.825 27.175,12.875 27.2,12.9 27.2,12.95 27.225,13 27.25,13.025 27.25,13.05 27.275,13.1 27.3,13.125 27.3,13.15 27.35,13.25 27.45,13.45 27.475,13.475 27.475,13.5 ; 27.475,13.499 27.475,13.575 27.5,13.6 27.5,13.625 27.525,13.65 27.525,13.675 27.625,13.775 27.625,13.8 27.65,13.825 27.65,14.025 27.675,14.05 27.675,14.075 27.775,14.175 28.025,14.175 28.15,14.05 28.175,14.05 28.2,14.025 28.25,14 28.3,14 U1.R2@28.325,13.975 ; v3(38.925,8.25) 38.925,8.425 39.075,8.575 39.075,8.6 39.1,8.625 39.1,8.975 v3(39.075,9.2)
  L3-SIG w0.1: v9(26.275,11.1) v3(26.475,11.525) ; v7(27.15,9) 27.225,8.6 27.25,8.575 27.25,8.55 27.425,8.375 27.45,8.375 27.475,8.35 27.6,8.35 28.025,7.925 28.05,7.925 28.075,7.9 28.1,7.9 28.125,7.875 v1(28.475,7.6) ; v1(38.15,8.2) v3(38.925,8.25) ; v3(38.325,9.125) 38.35,9.15 v3(39.075,9.2)
  L4-SIG w0.1: v1(28.475,7.6) 36.2,7.6 36.95,7.925 36.975,7.95 37,7.95 37.05,7.975 v1(38.15,8.2)
  Bottom Layer w0.1: v9(26.275,11.1) 26.3,10.75 26.325,10.7 26.65,10.375 26.65,10.35 26.675,10.3 26.7,10.275 26.7,10.25 26.75,10.2 26.75,10.175 26.775,10.125 26.8,10.1 26.8,10.075 26.85,10.025 26.85,10 26.875,9.95 26.9,9.925 26.9,9.9 26.95,9.85 26.95,9.825 26.975,9.8 26.975,9.775 27,9.75 27,9.725 27.05,9.675 27.05,9.65 27.075,9.6 27.1,9.575 27.1,9.55 v7(27.15,9)
  other v1: 26.275,11.1
  other v5: 38.925,8.25 38.325,9.125 39.075,9.2 26.475,11.525
  other v10: 26.275,11.1
A6: U1.P3 U3.H3 | length 10.8
  Top Layer w0.076: v3(34.875,11.25) 35,11.125 35.675,11.125 35.7,11.1 35.725,11.1 35.75,11.075 35.775,11.075 36.05,10.8 36.05,10.775 36.075,10.75 36.1,10.7 36.1,10.55 36.475,10.175 36.875,10.175 U3.H3@37.25,9.875
  L3-SIG w0.1: v8@27.9,13.425 28.5,13.225 28.525,13.2 28.55,13.2 28.725,13.025 28.75,13.025 28.825,13 28.85,12.975 28.875,12.975 28.9,12.95 28.925,12.95 28.95,12.925 28.975,12.925 29,12.9 29.05,12.9 29.075,12.875 29.1,12.875 29.125,12.85 29.15,12.85 29.225,12.825 29.25,12.8 29.275,12.8 29.3,12.775 29.325,12.775 29.35,12.75 29.4,12.75 29.45,12.725 29.5,12.7 29.575,12.675 29.6,12.65 29.625,12.65 29.65,12.625 29.675,12.625 29.7,12.6 29.75,12.6 29.8,12.575 31.275,12.55 32.4,11.45 32.45,11.425 32.475,11.4 32.5,11.4 32.575,11.375 32.6,11.35 32.625,11.35 32.65,11.325 32.675,11.325 32.75,11.3 32.8,11.275 v3(34.875,11.25)
  other v4: 27.9,13.43
  other v5: 34.875,11.25
  other v8: 27.9,13.43
A7: U1.N3 U3.H2 | length 10.6
  Top Layer w0.076: v7(37.2,9.075) U3.H2@37.25,9.075
  L4-SIG w0.1: v1@27.9,12.925 32.15,12.475 34.4,10.825 34.425,10.8 34.45,10.8 36.05,9.2 v7(37.2,9.075)
  other v1: 27.9,12.93
  other v4: 27.9,12.93
  other v8: 27.9,12.93
A8: U1.M3 U3.H1 | length 12.1
  Top Layer w0.076: v3(37.275,8.45) U3.H1@37.35,8.375
  L3-SIG w0.1: v1(33.625,10.95) 36.7,10.825 36.725,10.8 36.75,10.8 36.925,10.625 36.925,10.6 36.95,10.575 36.95,10.375 36.925,10.35 36.925,10.325 36.85,10.25 36.85,8.875 v3(37.275,8.45)
  L4-SIG w0.1: v1@27.9,12.425 30.5,12.15 31.6,12.125 31.625,12.1 31.65,12.1 31.7,12.075 31.725,12.05 31.75,12.05 31.8,12 31.825,12 31.875,11.95 31.9,11.95 31.95,11.9 31.975,11.9 32,11.875 32.025,11.875 32.075,11.825 32.1,11.825 32.15,11.775 32.175,11.775 32.2,11.75 32.225,11.75 32.275,11.7 32.3,11.7 32.35,11.65 32.375,11.65 32.425,11.6 32.45,11.6 32.475,11.575 32.5,11.575 32.55,11.525 32.575,11.525 32.625,11.475 32.65,11.475 32.7,11.45 32.75,11.4 32.775,11.4 32.825,11.35 32.85,11.35 32.9,11.3 32.925,11.3 33.3,11.275 v1(33.625,10.95)
  other v1: 27.9,12.43
  other v4: 27.9,12.43
  other v5: 37.275,8.45
  other v8: 27.9,12.43
A9: U1.N2 U3.G3 | length 8.8
  Top Layer w0.076: v3(36.425,9.875) U3.G3@36.45,9.875
  L3-SIG w0.1: v8@28.4,12.925 29.606,12.403 ; 29.6,12.4 29.65,12.375 29.725,12.35 30.075,12.225 30.1,12.2 30.125,12.2 30.15,12.175 30.175,12.175 30.2,12.15 30.225,12.15 30.25,12.125 30.275,12.125 30.7,11.925 ; 30.709,11.925 33.25,10.825 33.275,10.8 33.3,10.8 33.525,10.575 33.875,10.425 34.15,10.15 34.2,10.125 v3(36.425,9.875)
  other v4: 28.4,12.93
  other v5: 36.425,9.875
  other v8: 28.4,12.93
A10: U1.W5 U3.H9 | length 17.6
  Top Layer w0.076: U1.W5@26.95,16 27.143,16.193 ; 27.15,16.2 v1(27.5,16.55) ; U3.H9@37.45,14.775 v7(38.075,15.425)
  L4-SIG w0.1: v1(27.5,16.55) 27.725,16.475 27.75,16.45 27.775,16.45 27.95,16.275 v6(28.2,16.275) ; v6(30,17.775) 30.525,17.8 30.55,17.8 30.575,17.825 30.6,17.825 30.625,17.85 31.475,18.025 33.225,18.1 33.25,18.075 33.275,18.075 33.35,18 v6(33.5,18) ; v9(35.25,18.725) 35.25,18.65 35.9,18 35.9,17.975 35.925,17.95 v6(36.525,16.9)
  Bottom Layer w0.1: v6(28.2,16.275) 28.2,16.675 ; 28.2,16.671 29.25,16.8 29.3,16.825 29.475,17 29.5,17 29.55,17.05 29.55,17.075 29.575,17.1 v6(30,17.775) ; v6(33.5,18) 33.5,17.2 33.725,16.975 34.45,16.95 34.872,16.929 ; 34.875,16.925 35.025,16.925 35.2,17.1 v9(35.25,18.725) ; 36.508,16.726 36.775,16.7 36.8,16.675 36.825,16.675 v7(38.075,15.425) ; 36.525,16.725 v6(36.525,16.9)
  other v2: 28.2,16.275 36.525,16.9 30,17.775 33.5,18
  other v4: 27.5,16.55
  other v8: 27.5,16.55
  other v10: 35.25,18.725
A11: U1.N1 U3.G2 | length 9.4
  Top Layer w0.076: U1.N1@28.975,12.875 29,12.875 29.025,12.85 29.075,12.85 29.1,12.825 29.125,12.825 29.175,12.775 29.25,12.775 29.275,12.75 29.3,12.75 29.35,12.7 29.375,12.7 31.625,11.675 31.65,11.65 32.375,11.65 32.4,11.625 32.425,11.625 32.45,11.6 32.475,11.6 32.5,11.575 32.525,11.575 32.55,11.55 32.575,11.55 32.6,11.525 32.625,11.525 32.85,11.3 33.425,11.3 33.475,11.275 33.5,11.25 33.525,11.25 33.55,11.225 33.575,11.225 33.675,11.125 34.525,11.125 34.55,11.1 34.575,11.1 34.6,11.075 34.625,11.075 34.75,10.95 35.625,10.95 35.65,10.925 35.675,10.925 35.9,10.7 35.9,10.675 35.925,10.65 35.925,10.175 36.1,10 36.1,9.975 36.125,9.95 36.125,9.6 U3.G2@36.55,9.175
A12: U1.L3 U3.G1 | length 12.1
  Top Layer w0.076: v3(36.425,8.275) U3.G1@36.45,8.275
  L3-SIG w0.1: v1(29.6,8.625) v1(29.7,9.65) ; v1(34.325,8.825) 34.9,9.4 35.375,8.975 35.4,8.95 35.425,8.95 36.1,8.275 v3(36.425,8.275)
  L4-SIG w0.1: v1@27.9,11.925 28.575,11.92 ; 28.575,11.925 28.575,11.4 28.6,11.325 28.625,11.3 28.625,11.275 29.7,10.2 v1(29.7,9.65) ; v1(29.6,8.625) 30.125,8.6 30.25,8.575 30.375,8.55 30.5,8.525 30.625,8.5 30.75,8.475 30.875,8.45 31,8.425 31.1,8.4 31.225,8.375 31.25,8.375 31.375,8.25 31.4,8.25 31.425,8.225 31.625,8.225 31.65,8.25 31.675,8.25 v1(34.325,8.825)
  other v1: 27.9,11.93
  other v4: 27.9,11.93
  other v5: 36.425,8.275
  other v8: 27.9,11.93
AIN15_N: C36.1 R13.1 U1.G2 | length 32
  Top Layer w0.076: v3(27.425,9.375) 27.6,9.375 27.8,9.175 28,9.175 28.15,9.325 28.15,9.575 28.325,9.75 28.325,9.825 U1.G2@28.35,9.85
  L3-SIG w0.076: v6(22.3,16.925) 23.15,17.825 23.3,17.975 23.65,17.975 23.675,18 23.7,18 23.725,18.025 23.775,18.025 23.8,18.05 23.825,18.05 23.85,18.075 23.875,18.075 23.9,18.1 23.925,18.1 24,18.175 24.05,18.2 24.075,18.2 24.1,18.225 24.725,18.225 24.925,18.35 24.975,18.4 ; v1(23.95,14.125) 24.775,13.3 24.775,11.925 24.8,11.9 24.8,11.875 25.075,11.6 25.625,10.875 25.65,10.85 25.65,10.8 25.775,10.675 25.8,10.675 26.475,10 26.8,10 v3(27.425,9.375) ; 24.97,18.395 25.35,18.775 25.4,18.8 27.425,18.8 v1(27.525,18.9) ; v1(34.875,17.175) v3(38.175,16.975)
  L4-SIG w0.076: v6(22.625,14.15) v1(23.95,14.125) ; v1(27.525,18.9) 27.85,18.475 28,18.325 28.225,18.15 28.325,18.15 29.025,17.45 30.475,17.45 30.65,17.625 32.825,17.625 33,17.45 34.6,17.45 v1(34.875,17.175)
  Bottom Layer w0.076: v6(22.3,16.925) 23,16.925 23.2,16.875 23.61,16.875 ; v6(22.625,14.15) 23.925,15.2 ; 23.6,16.875 23.65,16.9 23.975,16.9 24.125,16.75 24.125,16.5 23.925,16.3 23.925,16 ; 23.925,15.191 23.925,16.007
  other v1: 22.3,16.925
  other v2: 22.625,14.15 22.3,16.925
  other v3: 22.825,17.35
  other v5: 27.425,9.375 38.175,16.975 22.825,17.35
AIN15_P: C36.2 R12.1 U1.G3 | length 22.6
  Top Layer w0.076: C36.2@24.3,16.975 24.425,16.7 24.575,16.55 v7(24.55,16.525) ; C36.2@24.3,17.6 v4(24.35,17.6) ; v3(29.975,18.6) 33.525,18.525 34.575,18.525 34.775,18.325 35.75,18.325 35.775,18.3 35.8,18.3 36.35,17.75 36.675,17.75 36.75,17.675 36.75,17.4 36.775,17.375 R12.1@36.95,16.975
  L3-SIG w0.076: v4(24.35,17.6) 25.3,17.6 25.625,17.925 26.4,17.925 26.775,18.3 28.7,18.3 29.025,18.625 29.95,18.625 v3(29.975,18.6) ; v1(25.025,15.05) 25.1,14.975 25.1,14.875 25.125,14.85 25.125,14.8 25.15,14.775 25.15,14.75 25.175,14.625 25.875,13.5 26.55,12.825 26.55,12.525 v1(26.825,12.25)
  L4-SIG w0.076: v7(24.55,16.525) 24.55,15.875 24.7,15.725 24.75,15.725 24.775,15.7 24.975,15.7 25.025,15.675 25.175,15.525 ; v1(25.025,15.05) 25.025,15.175 25.15,15.3 25.15,15.35 25.175,15.375 25.175,15.52 ; v1(26.825,12.25) 27.375,11.7 27.6,10.425 27.6,10.4 27.625,10.375 27.625,10.275 27.775,10.125 v1@27.9,9.925
  other v1: 27.9,9.93
  other v4: 27.9,9.93
  other v5: 29.975,18.6
  other v8: 27.9,9.93 24.35,17.6
AIN16_N: C37.1 R17.1 U1.J2 | length 20.3
  Top Layer w0.076: R17.1@21.375,17.075 21.6,17.175 22.325,17.9 22.85,17.9 23.025,18.075 23.975,18.075 24.025,18.025 24.5,18.025 C37.1@24.85,17.675 ; v7(26.675,9.65) 27.7,10.675 28,10.675 28.2,10.875 U1.J2@28.325,10.875
  L3-SIG w0.076: v1(25.05,12) 25.05,12.35 25.125,13.2 v7(25.425,13.5)
  L4-SIG w0.076: v1(25.05,12) 25.45,11.6 25.45,10.825 25.475,10.8 25.475,10.75 25.5,10.725 25.5,10.7 25.7,10.5 25.725,10.5 25.75,10.475 25.775,10.475 25.825,10.425 25.85,10.425 25.875,10.4 25.9,10.4 25.95,10.35 v7(26.675,9.65) ; v1(25.125,17.225) 25.317,17.017 ; 25.325,17.025 25.6,17.3 25.875,17.3 26.275,17.2 ; 26.287,17.19 v9(26.575,17.575) ; v9(26.575,16.1) v6(27.1,16.45)
  Bottom Layer w0.076: v7(25.425,13.5) 25.425,14.2 26.182,14.957 ; 26.175,14.95 26.525,14.95 26.55,14.975 26.575,14.975 26.6,15 26.625,15 26.925,15.3 26.95,15.3 27.25,15.575 27.35,15.6 27.75,15.875 27.9,16.025 27.9,16.275 27.75,16.425 27.125,16.425 v6(27.1,16.45) ; v10@26.575,16.075 v9(26.575,16.1) ; v9(26.575,17.575) 26.55,17.55 26.55,17.075 26.475,17 26.45,17 26.175,16.725 26.175,16.55 26.175,16.475 v10@26.603,16.047
  other v2: 27.1,16.45
  other v3: 25.125,17.225
  other v5: 25.125,17.225
  other v10: 26.575,16.1 26.575,17.575
AIN16_P: C37.2 R16.1 U1.H2 | length 20
  Top Layer w0.076: 26.15,15.3 26.15,15.55 26.275,15.675 26.5,15.675 26.525,15.7 v4(26.65,15.7) ; 26.15,15.303 26.15,14.825 26.225,14.75 v4(26.225,14.625) ; v3(26.65,14.25) 26.55,14.15 26.55,12.575 26.45,12.075 26.2,11.825 26.2,11.4 26.35,11.25 26.6,11.25 v4(27.075,11.35)
  L3-SIG w0.076: v3(20.175,17.05) 20.575,17.25 v1(21.125,17.775) ; v1(21.675,17.225) 21.825,17.075 21.94,17.075 ; 21.95,17.075 22.3,17.425 22.5,17.425 23.2,18.125 23.25,18.15 v6(23.55,18.4) ; v4(26.225,14.625) v3(26.65,14.25) ; 26.365,16.035 26.45,15.95 v4(26.65,15.7) ; 26.375,16.025 26.45,16.375 26.45,16.4 26.475,16.425 v1(26.475,16.8) v3(26.475,17.2) ; v4(27.075,11.35) v1(27.35,10.3) ; v8@28.4,10.425 v1(28.725,10.1)
  L4-SIG w0.076: v1(21.125,17.775) v1(21.675,17.225) ; v6(25.25,16.7) 25.6,16.7 25.875,16.7 25.975,16.8 v1(26.475,16.8) ; v1(27.35,10.3) 27.625,9.875 27.65,9.85 27.65,9.8 27.775,9.675 28.025,9.675 28.45,10.1 v1(28.725,10.1)
  Bottom Layer w0.076: v6(23.55,18.4) 23.675,18.275 24.5,18.275 24.575,18.2 24.575,16.975 24.654,16.896 ; 24.65,16.9 25.125,16.6 25.225,16.675 v6(25.25,16.7)
  other v1: 23.55,18.4
  other v2: 25.25,16.7 23.55,18.4
  other v4: 28.4,10.43
  other v5: 26.65,14.25 20.175,17.05 26.475,17.2
  other v8: 28.4,10.43 27.075,11.35 26.225,14.625 26.65,15.7
ANALOG-IO0: R10.2 X2.5 | length 29.9
  Top Layer w0.076: R10.2@35.375,16.775 35.4,16.725 35.625,16.5 35.825,16.5 v3(35.925,16.4)
  L3-SIG w0.076: X2.5@17.125,1.55 21.075,5.1 21.65,5.1 22.775,6.225 v1(22.825,6.225) ; v1(35.75,11.8) v1(36.175,12.225) ; v3(35.925,16.4) 37.325,15 37.35,14.95 37.35,14.625 v1(37.4,14.575)
  L4-SIG w0.076: v1(22.825,6.225) v6(27.375,6.925) ; v6(30.425,9.95) 30.875,9.975 ; 30.877,9.969 v6(33.575,10.075) ; v6(35.625,10.075) 35.625,10.225 35.75,10.35 v1(35.75,11.8) ; v1(36.175,12.225) 37.375,13.7 37.4,13.75 v1(37.4,14.575)
  Bottom Layer w0.076: v6(27.375,6.925) 30.4,9.95 v6(30.425,9.95) ; v6(33.575,10.075) v6(35.625,10.075)
  other v2: 27.375,6.925 30.425,9.95 33.575,10.075 35.625,10.075
  other v5: 35.925,16.4
ANALOG-IO1: R14.2 X2.6 | length 30.2
  Top Layer w0.076: v7(39.575,12.85) R14.2@39.95,16.775
  L3-SIG w0.076: X2.6@19.675,1.525 20.15,2 20.7,2 21.675,2.975 22.025,2.975 v1(24.1,5.05)
  L4-SIG w0.076: v1(24.1,5.05) 24.65,5.6 25.25,5.6 26.125,6.475 v6(26.375,6.475) ; v6(32.2,9.475) 32.45,9.4 34.5,9.4 34.525,9.375 34.55,9.375 34.575,9.35 35.6,9.35 35.925,9.025 35.95,9.025 35.975,9 36.05,9 36.075,8.975 36.275,8.975 36.3,8.95 36.5,8.95 36.525,8.925 36.75,8.925 36.775,8.9 36.9,8.9 37.025,8.775 37.05,8.775 37.075,8.75 37.325,8.75 37.35,8.775 37.375,8.775 37.5,8.9 37.5,8.925 37.525,8.95 37.525,10.8 v7(39.575,12.85)
  Bottom Layer w0.076: v6(26.375,6.475) 26.55,6.65 27.5,6.65 30.325,9.475 v6(32.2,9.475)
  other v2: 26.375,6.475 32.2,9.475
AREF: X2.3

## Text inside footprints (layer, text, board x,y; h text height)
U$2: Mechanical 3 "CC" at 54.968,-5.27 h3.94
U$3: Mechanical 3 "BY" at 59.476,-9.334 h2.76
U$4: Mechanical 3 "SA" at 63.476,-9.334 h2.76
U$5: Mechanical 3 "C" at 67.628,-5.93 h5.91